# Altium PCB F101S3_KSDIY_V2.PcbDoc (part 2 of 2)
Units mil, origin at the board's own origin, x right, y up, seen from the top; angles counter-clockwise.
Board outline 2606.3 x 2883.86 mil, 2 copper layers (Top Layer, Bottom Layer), stack 54.726 mil thick; 152 components, 110 nets, 618 pads, 637 vias.
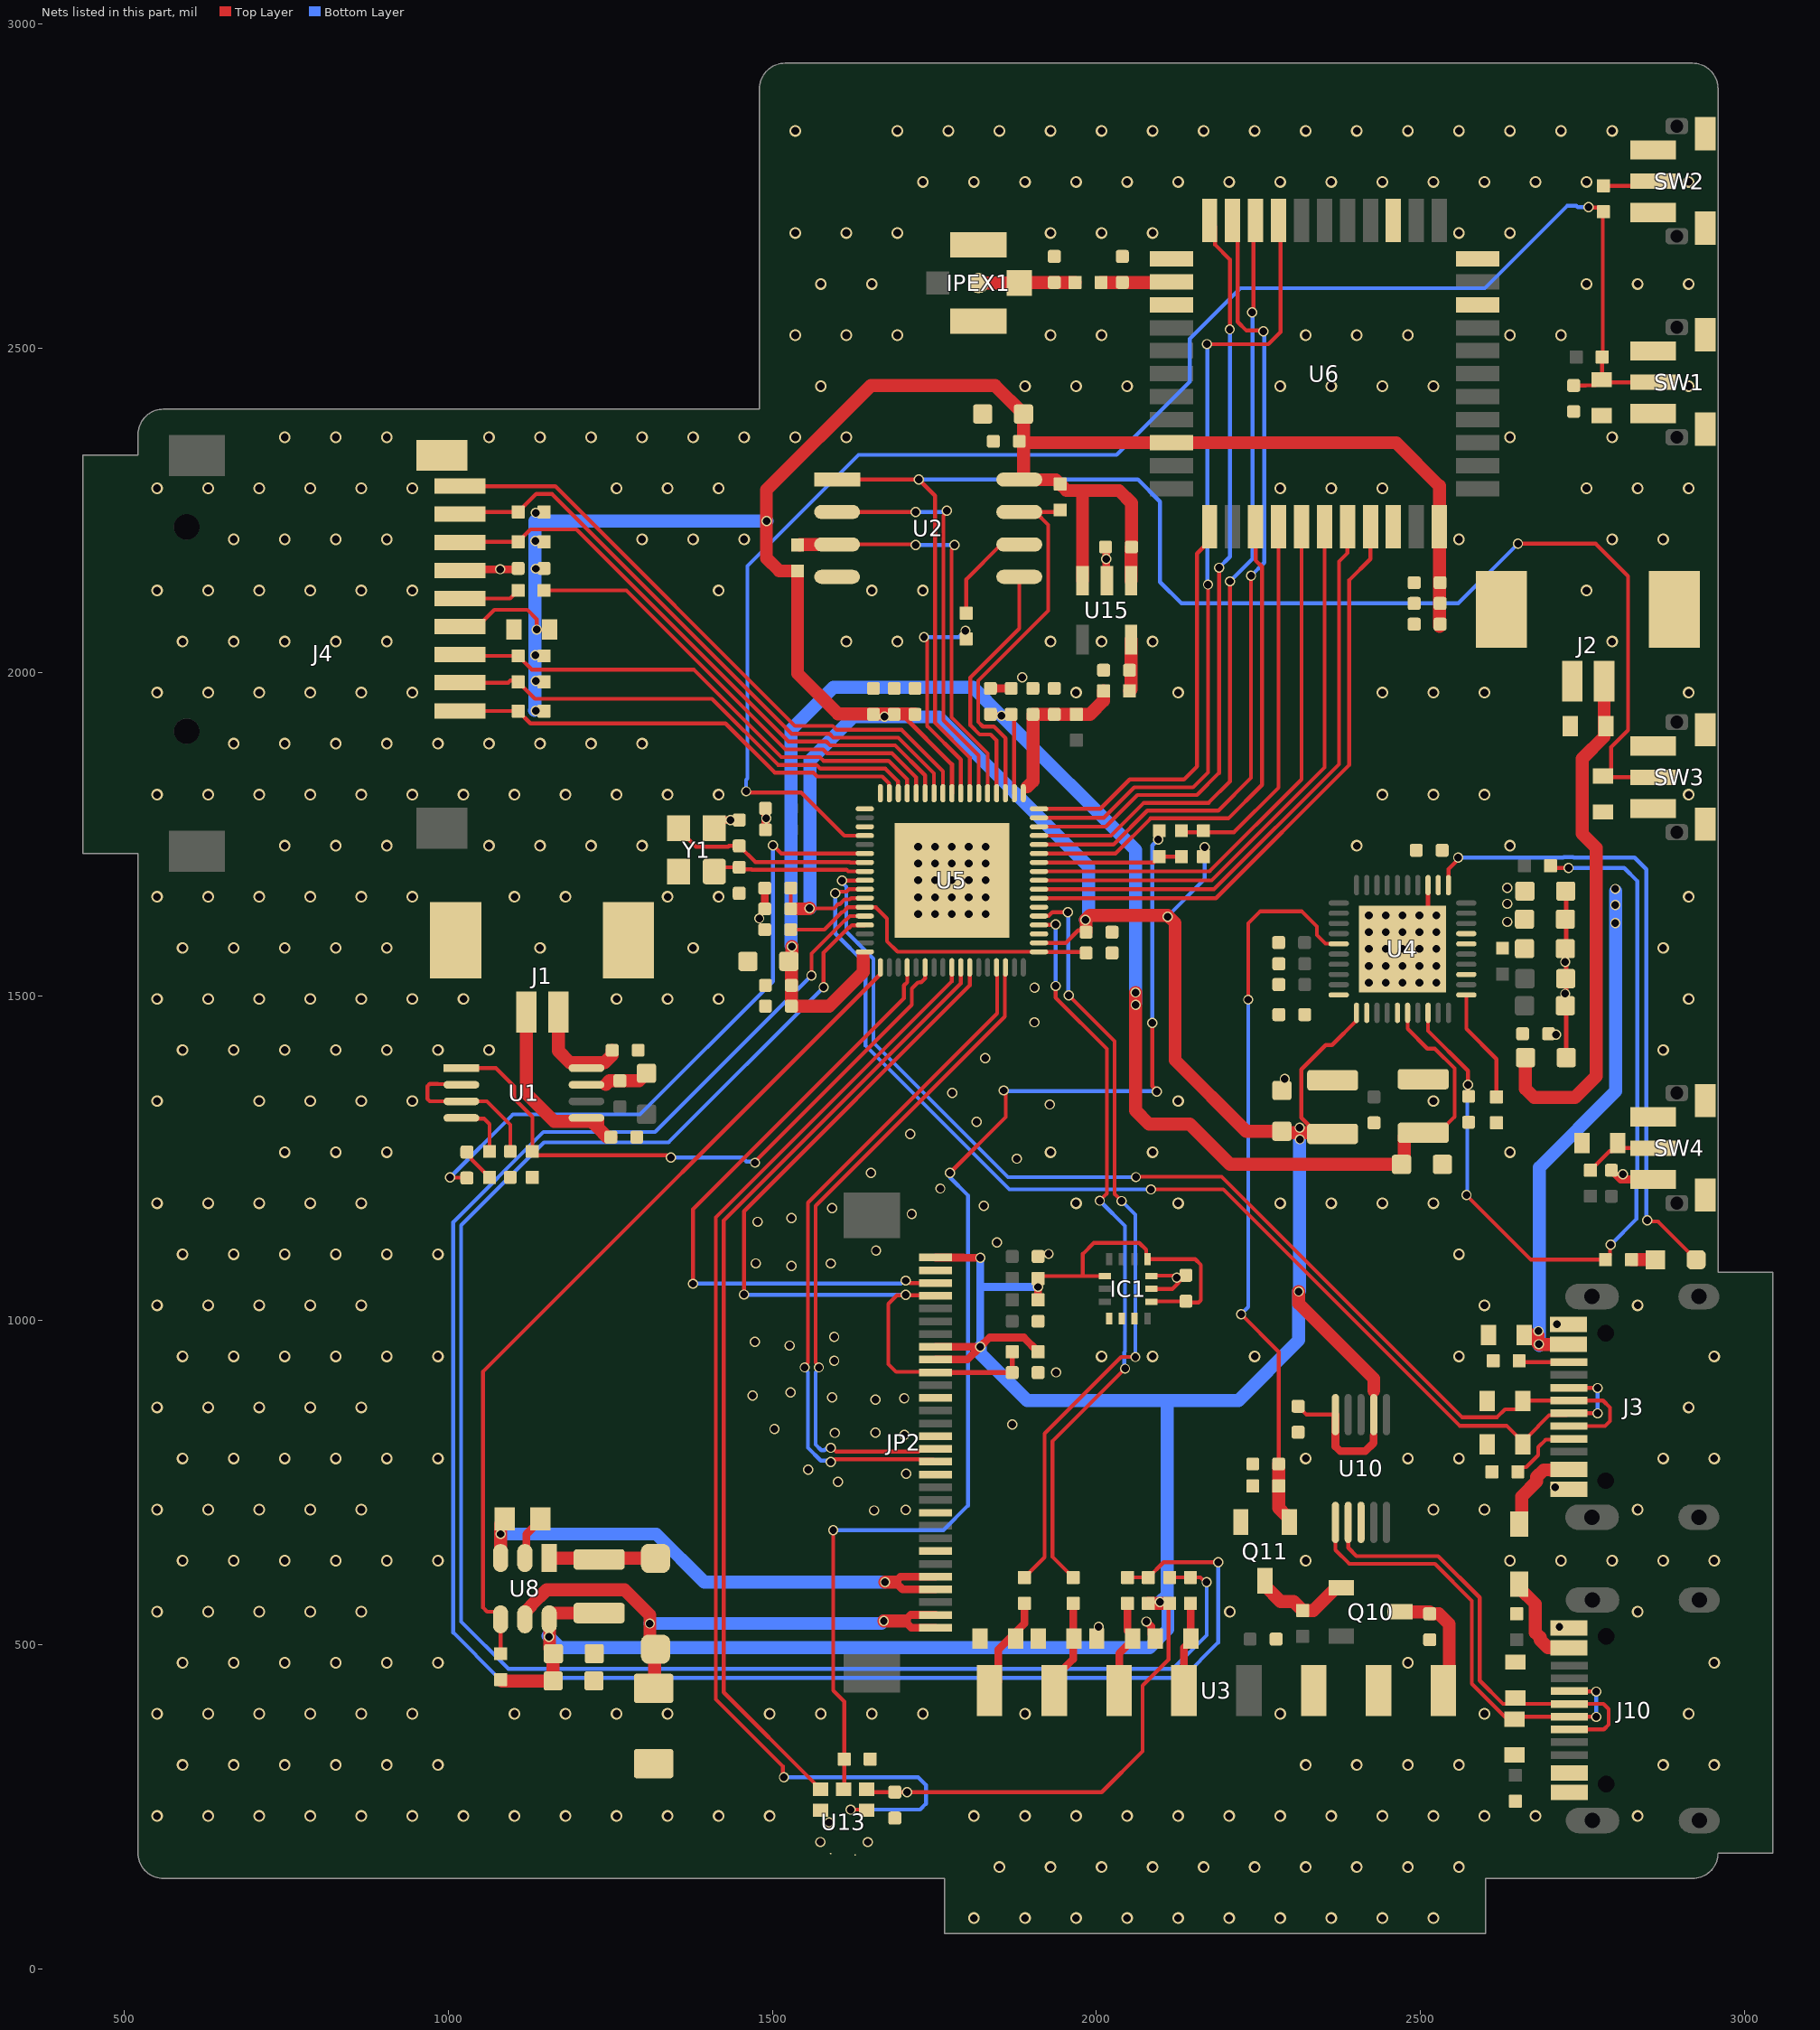
[diagram p2: the nets of this part, all layers, seen from the top]

## Via types
v1: diameter 17.99, hole 12, Top Layer to Bottom Layer, tented both sides, 383 vias
v2: diameter 15.75, hole 11.81, Top Layer to Bottom Layer, tented both sides, 204 vias
v3: diameter 18, hole 12, Top Layer to Bottom Layer, tented both sides, 50 vias

## Nets (pads, with @x,y where several pads share a name; then routed paths per layer and width w, separated by ;. In a path a pad name is that pad's centre, name@x,y a point inside that pad or via, vN(x,y) a via of type N, cw(c..) or ccw(c..) an arc to the next point about the centre after c; other vN are vias at no path point) (continued)
DSI_D1_N: JP2.16 U5.15 | length 1055.1
  Top Layer w6: v2(1571.75,928) 1571.75,930.64 1566.87,935.51 1566.87,1176.9 1843.13,1453.16 1851.76,1461.79 1858.79,1468.82 1858.79,1532.96 1859.68,1533.85 U5.15@1859.68,1544.69 ; v2(1590,804) 1592.64,804 1598.32,798.32 1725.74,798.32 1726.68,799.25 1748.94,799.25 JP2.16@1751.85,802.16
  Bottom Layer w6: v2(1571.75,928) 1571.75,925.36 1566.87,920.49 1566.87,809.02 1575.64,800.25 1580.61,800.25 1582.5,802.13 1588.13,802.13 v2(1590,804)
DSI_D1_P: JP2.17 U5.14 | length 1075.2
  Top Layer w6: v2(1550,928) 1550,930.64 1554.87,935.51 1554.87,1181.87 1831.13,1458.13 1846.79,1473.79 1846.79,1532.96 1845.9,1533.85 U5.14@1845.9,1544.69 ; v2(1590,782.25) 1592.64,782.25 1596.7,786.32 1725.74,786.32 1726.68,785.38 1748.94,785.38 JP2.17@1751.85,782.47
  Bottom Layer w6: v2(1550,928) 1550,925.36 1554.87,920.49 1554.87,804.05 1574.8,784.12 1588.13,784.12 v2(1590,782.25)
DXIN: C8.1 U5.58 Y1.3 | length 311.3
  Top Layer w6: Y1.3@1355.44,1759.46 1355.44,1757.5 1382.16,1730.78 1432,1730.78 1433.22,1732 C8.1@1449,1732 1473.71,1707.29 1619.57,1707.29 1620.3,1706.56 U5.58@1642.69,1706.56
DXOUT: C9.1 U5.59 Y1.1 | length 237.4
  Top Layer w6: Y1.1@1410.56,1692.54 1417.02,1699 C9.1@1449,1699 1451.97,1696.03 1468,1696.03 1468.74,1695.29 1614.6,1695.29 1617.11,1692.78 U5.59@1642.69,1692.78
GND: C1.2 C2.2 C4.1 C5.2 C6.1 C7.2 C8.2 C9.2 C10.2 C11.2 C12.1 C13.2 C36.1 C37.1 C38.2 C39.1 C40.2 C41.2 C42.1 C43.1 C44.1 C45.2 C46.1 C47.1 C48.1 C49.1 C51.2 C52.2 C53.2 C54.1 C55.1 C60.2 C61.1 C62.1 C63.1 C64.1 C65.1 C66.1 C67.1 C68.1 C69.1 C70.1 C71.1 C72.1 C73.1 C74.1 C75.1 C76.1 C77.1 C78.2 C79.2 C80.2 C84.1 C91.1 C93.1 C94.1 C95.1 C102.2 C103.2 C104.2 C105.2 C110.2 C111.2 C113.2 D1.2 D3.2 D4.2 D5.2 D6.2 D7.2 D8.2 D9.2 D12.1 D19.2 D110.2 D111.2 D112.2 D113.2 IC1.1 IC1.2 IC1.3 IC1.6 IC1.7 IPEX1.2 J1.0 J2.0 J2.2 J3.0 J3.A1 J3.A12 J3.B1 J3.B12 J4.6 J4.10 J10.0 J10.A1 J10.A12 J10.B1 J10.B12 JP2.2 JP2.12 JP2.15 JP2.18 JP2.21 JP2.24 Q11.2 R4.1 R12.2 R20.1 R21.2 R38.1 R100.2 R101.2 R104.2 R121.2 SW1.1 SW1.3 SW1.4 SW1.5 SW2.1 SW2.3 SW2.4 SW2.5 SW3.1 SW3.3 SW3.4 SW3.5 SW4.1 SW4.3 SW4.4 SW4.5 U1.7 U2.4 U3.6 U3.7 U4.3 U4.41 U5.69 U6.1 U6.3 U6.20 U6.31 U6.33 U6.36 U8.2 U10.3 U13.2 U13.3 U15.2 Y1.2 Y1.4 | length 969.4
  Top Layer w6: IC1.6@2084.93,1049 2117,1049 2137.34,1069.34 2085.58,1069.34 IC1.7@2084.93,1068.68
  Top Layer w7: v3(2498.05,1625.15) 2499.99,1625.15 2511.42,1636.58 U4.3@2511.42,1671.55 ; C36.1@2723.77,1662.32 2724.22,1661.87 2724.22,1406 C45.2@2724.67,1405.55
  Top Layer w8: v3(1829,1653) 1829,1650.56 U5.69@1839.93,1639.63
  Top Layer w12: J4.6@1018,2156.92 1019.54,2158.46 1106.46,2158.46 C60.2@1108,2160 ; U8.2@1118.4,633.99 1120.63,636.21 1120.63,670.6 1142.56,692.53 R38.1@1142.56,694.5 ; Y1.2@1410.56,1759.46 1410.56,1760.28 1422.28,1772 C8.2@1449,1772 ; C75.1@1488.44,1635 C76.1@1488.44,1667 ; C63.1@1489.44,1757 C65.1@1489.44,1790 ; C67.1@1836.5,1975 C72.1@1868.5,1975 ; C104.2@2014,2193 2014.95,2192.05 2014.95,2141.87 U15.2@2015.9,2140.92 ; v2(2077,536) 2084.64,528.36 2084.64,515.81 D111.2@2090.45,510 ; C51.2@2794.2,1231.86 2808.29,1217.77 SW4.1@2858.62,1217.77
  Top Layer w20: 1243.1,1364 1249,1369.9 1294.5,1369.9 C11.2@1306,1381.39
  other v1: 1811.02,78.74 1889.76,78.74 1968.51,78.74 2047.25,78.74 2125.99,78.74 2204.73,78.74 2283.47,78.74 2362.21,78.74 2440.95,78.74 2519.69,78.74 1850.39,157.48 1929.13,157.48 2007.88,157.48 2086.62,157.48 2165.36,157.48 2244.1,157.48 2322.84,157.48 2401.58,157.48 2480.32,157.48 2559.06,157.48 551.18,236.22 629.92,236.22 708.66,236.22 787.4,236.22 866.14,236.22 944.88,236.22 1023.62,236.22 1102.36,236.22 1181.1,236.22 1259.84,236.22 1338.58,236.22 1417.32,236.22 1496.06,236.22 1811.02,236.22 1889.76,236.22 1968.51,236.22 2047.25,236.22 2125.99,236.22 2204.73,236.22 2283.47,236.22 2362.21,236.22 2440.95,236.22 2519.69,236.22 2598.43,236.22 2677.17,236.22 2834.65,236.22 590.55,314.96 669.29,314.96 748.03,314.96 826.77,314.96 905.51,314.96 984.25,314.96 2322.84,314.96 2401.58,314.96 2480.32,314.96 2559.06,314.96 2874.02,314.96 2952.76,314.96 551.18,393.7 629.92,393.7 708.66,393.7 787.4,393.7 866.14,393.7 944.88,393.7 1102.36,393.7 1181.1,393.7 1259.84,393.7 1338.58,393.7 1496.06,393.7 1574.8,393.7 1653.54,393.7 1732.28,393.7 1889.76,393.7 2283.47,393.7 2598.43,393.7 2913.39,393.7 590.55,472.44 669.29,472.44 748.03,472.44 826.77,472.44 905.51,472.44 984.25,472.44 2480.32,472.44 2952.76,472.44 551.18,551.18 629.92,551.18 708.66,551.18 787.4,551.18 866.14,551.18 2205.65,551.18 2834.65,551.18 590.55,629.92 669.29,629.92 748.03,629.92 826.77,629.92 905.51,629.92 984.25,629.92 2322.84,629.92 2637.8,629.92 2716.54,629.92 2795.28,629.92 2874.02,629.92 2952.76,629.92 551.18,708.66 629.92,708.66 708.66,708.66 787.4,708.66 866.14,708.66 2519.69,708.66 2598.43,708.66 2834.65,708.66 590.55,787.4 669.29,787.4 748.03,787.4 826.77,787.4 905.51,787.4 984.25,787.4 2322.84,787.4 2480.32,787.4 2559.06,787.4 2874.02,787.4 2952.76,787.4 551.18,866.14 629.92,866.14 708.66,866.14 787.4,866.14 866.14,866.14 2913.39,866.14 590.55,944.88 669.29,944.88 748.03,944.88 826.77,944.88 905.51,944.88 984.25,944.88 2007.88,944.88 2086.62,944.88 2244.1,944.88 2559.06,944.88 2952.76,944.88 551.18,1023.62 629.92,1023.62 708.66,1023.62 787.4,1023.62 866.14,1023.62 2598.43,1023.62 2834.65,1023.62 590.55,1102.36 669.29,1102.36 748.03,1102.36 826.77,1102.36 905.51,1102.36 984.25,1102.36 2559.06,1102.36 551.18,1181.1 629.92,1181.1 708.66,1181.1 787.4,1181.1 866.14,1181.1 1968.51,1181.1 2125.99,1181.1 2283.47,1181.1 2362.21,1181.1 2440.95,1181.1 2519.69,1181.1 748.03,1259.84 826.77,1259.84 905.51,1259.84 1929.13,1259.84 2086.62,1259.84 2637.8,1259.84 551.18,1338.58 708.66,1338.58 787.4,1338.58 866.14,1338.58 944.88,1338.58 2125.99,1338.58 2519.69,1338.58 590.55,1417.32 669.29,1417.32 748.03,1417.32 826.77,1417.32 905.51,1417.32 984.25,1417.32 1062.99,1417.32 2874.02,1417.32 551.18,1496.06 629.92,1496.06 708.66,1496.06 787.4,1496.06 866.14,1496.06 944.88,1496.06 1023.62,1496.06 1259.84,1496.06 1338.58,1496.06 1417.32,1496.06 2913.39,1496.06 590.55,1574.8 669.29,1574.8 748.03,1574.8 826.77,1574.8 905.51,1574.8 1141.73,1574.8 1377.95,1574.8 2874.02,1574.8 551.18,1653.54 629.92,1653.54 708.66,1653.54 787.4,1653.54 866.14,1653.54 944.88,1653.54 1102.36,1653.54 1181.1,1653.54 1338.58,1653.54 1417.32,1653.54 2913.39,1653.54 748.03,1732.28 826.77,1732.28 905.51,1732.28 1062.99,1732.28 1141.73,1732.28 1220.47,1732.28 1299.21,1732.28 2401.58,1732.28 2637.8,1732.28 551.18,1811.02 629.92,1811.02 708.66,1811.02 787.4,1811.02 866.14,1811.02 944.88,1811.02 1023.62,1811.02 1102.36,1811.02 1181.1,1811.02 1259.84,1811.02 1338.58,1811.02 1417.32,1811.02 2440.95,1811.02 2519.69,1811.02 2598.43,1811.02 2913.39,1811.02 669.29,1889.76 748.03,1889.76 826.77,1889.76 905.51,1889.76 984.25,1889.76 1062.99,1889.76 1141.73,1889.76 1220.47,1889.76 1299.21,1889.76 551.18,1968.51 629.92,1968.51 708.66,1968.51 787.4,1968.51 866.14,1968.51 944.88,1968.51 1968.51,1968.51 2125.99,1968.51 2440.95,1968.51 2519.69,1968.51 2598.43,1968.51 2913.39,1968.51 590.55,2047.25 669.29,2047.25 748.03,2047.25 826.77,2047.25 905.51,2047.25 1614.17,2047.25 1692.91,2047.25 1929.13,2047.25 2007.88,2047.25 2086.62,2047.25 2795.28,2047.25 551.18,2125.99 629.92,2125.99 708.66,2125.99 787.4,2125.99 866.14,2125.99 944.88,2125.99 1417.32,2125.99 1653.54,2125.99 1732.28,2125.99 2755.91,2125.99 669.29,2204.73 748.03,2204.73 826.77,2204.73 905.51,2204.73 1299.21,2204.73 1377.95,2204.73 1456.69,2204.73 2559.06,2204.73 2795.28,2204.73 2874.02,2204.73 551.18,2283.47 629.92,2283.47 708.66,2283.47 787.4,2283.47 866.14,2283.47 944.88,2283.47 1259.84,2283.47 1338.58,2283.47 1417.32,2283.47 2283.47,2283.47 2362.21,2283.47 2440.95,2283.47 2755.91,2283.47 2834.65,2283.47 2913.39,2283.47 748.03,2362.21 826.77,2362.21 905.51,2362.21 1062.99,2362.21 1141.73,2362.21 1220.47,2362.21 1299.21,2362.21 1377.95,2362.21 1456.69,2362.21 1535.43,2362.21 1614.17,2362.21 2637.8,2362.21 2795.28,2362.21 1574.8,2440.95 1889.76,2440.95 1968.51,2440.95 2047.25,2440.95 2283.47,2440.95 2362.21,2440.95 2440.95,2440.95 2519.69,2440.95 2913.39,2440.95 1535.43,2519.69 1614.17,2519.69 1692.91,2519.69 1929.13,2519.69 2007.88,2519.69 2322.84,2519.69 2401.58,2519.69 2480.32,2519.69 2637.8,2519.69 2716.54,2519.69 1574.8,2598.43 1653.54,2598.43 2755.91,2598.43 2834.65,2598.43 2913.39,2598.43 1535.43,2677.17 1614.17,2677.17 1692.91,2677.17 1929.13,2677.17 2007.88,2677.17 2086.62,2677.17 2559.06,2677.17 2637.8,2677.17 1732.28,2755.91 1811.02,2755.91 1889.76,2755.91 1968.51,2755.91 2047.25,2755.91 2125.99,2755.91 2204.73,2755.91 2283.47,2755.91 2362.21,2755.91 2440.95,2755.91 2519.69,2755.91 2598.43,2755.91 2677.17,2755.91 2755.91,2755.91 2913.39,2755.91 1535.43,2834.65 1692.91,2834.65 1771.65,2834.65 1850.39,2834.65 1929.13,2834.65 2007.88,2834.65 2086.62,2834.65 2165.36,2834.65 2244.1,2834.65 2322.84,2834.65 2401.58,2834.65 2480.32,2834.65 2559.06,2834.65 2637.8,2834.65 2716.54,2834.65 2795.28,2834.65
  other v2: 1574.07,196.06 1647.45,195.95 1587.69,226.26 2003.46,528.05 2714.03,528.19 1656.97,707.31 1705.62,708.06 2707.15,742.96 1601.21,751.47 1706.37,763.82 1555.19,770.18 1703.75,823.7 1596.32,826.99 1659.19,827.48 1503.31,832.86 1870,840 1659.22,878.33 1703.38,880.2 1592.37,881.49 1469.49,884.67 1528.02,889.34 1937.72,920.26 1595.51,937.99 1526.98,961.54 1473.09,967.42 1595.51,975.14 2710.47,994.82 2124.02,1066.26 1529.59,1084.48 1474.53,1088.31 1590.11,1088.22 1926.24,1102.92 1660.07,1108.27 1846.59,1120.8 1477.41,1152.35 1529.59,1158.24 1715.11,1164.48 1592.46,1173.52 1826.35,1177.06 1759.13,1203.79 2811.89,1225.59 1652.21,1227.77 1877.06,1249.78 1712.75,1287.91 1814.95,1306.78 1928.06,1333.28 1777.61,1351.2 2290.42,1372.69 1828.31,1404.65 2709,1441 1904.18,1460.08 2723.04,1504.09 1904.61,1513.56 2723.04,1553.37 1479.88,1620.28 1435.64,1772 1490.85,1774.55 1885.36,1992.2 1080.39,2158.74 2015.2,2174.56
  other v3: 2420.05,1521.15 2446.05,1521.15 2472.05,1521.15 2498.05,1521.15 2524.05,1521.15 2420.05,1547.15 2446.05,1547.15 2472.05,1547.15 2498.05,1547.15 2524.05,1547.15 2420.05,1573.15 2446.05,1573.15 2472.05,1573.15 2498.05,1573.15 2524.05,1573.15 2420.05,1599.15 2446.05,1599.15 2472.05,1599.15 2498.05,1599.15 2524.05,1599.15 2420.05,1625.15 2446.05,1625.15 2472.05,1625.15 2524.05,1625.15 1725,1627 1751,1627 1777,1627 1803,1627 1829,1627 1725,1653 1751,1653 1777,1653 1803,1653 1725,1679 1751,1679 1777,1679 1803,1679 1829,1679 1725,1705 1751,1705 1777,1705 1803,1705 1829,1705 1725,1731 1751,1731 1777,1731 1803,1731 1829,1731
H_RX: D113.1 R113.2 U3.1 | length 156.9
  Top Layer w12: U3.1@1835,429.45 1848.68,443.13 1848.68,492.76 1889,533.08 R113.2@1889,564
H_SCL: D111.1 R111.2 U3.4 | length 139.2
  Top Layer w12: U3.4@2135,429.45 2135,495.5 2145.57,506.06 D111.1@2145.57,510 2145.28,510.28 2145.28,563.72 R111.2@2145,564
H_SDA: D110.1 R110.2 U3.3 | length 147
  Top Layer w12: U3.3@2035,429.45 2035,486.82 2048.43,500.25 2049.76,500.25 2055.57,506.06 D110.1@2055.57,510 2055.57,513.94 2048,521.5 R110.2@2048,564
H_TX: D112.1 R112.2 U3.2 | length 146.6
  Top Layer w12: U3.2@1935,429.45 1935,449.13 1964,478.13 R112.2@1964,564
HPOUT: C3.1 U5.57 | length 1006.3
  Top Layer w6: v2(1003,1221) 1003.5,1220.5 1028.5,1220.5 C3.1@1029,1220 ; v2(1501.22,1733.01) 1513.89,1720.34 U5.57@1642.69,1720.34
  Bottom Layer w6: v2(1003,1221) 1100,1318 1296,1318 1501.22,1523.22 v2(1501.22,1733.01)
I2C2_SCL: R111.1 R118.2 U5.65 | length 2800.9
  Top Layer w6: v2(1579.35,1514.29) 1579,1514.64 1579,1567.57 1617.64,1606.21 1619.14,1606.21 1622.7,1609.77 1642.36,1609.77 U5.65@1642.69,1610.1 ; R118.2@2113,604 2160.36,604 2167.36,597 v2(2170,597)
  Bottom Layer w6: v2(1579.35,1514.29) 1339.94,1274.87 1147.84,1274.87 1020,1147.03 1020,536 1093,463 2118,463 2170,515 v2(2170,597)
I2C2_SDA: R110.1 R117.2 U5.64 | length 2987.5
  Top Layer w6: v2(1560.49,1532.18) 1560.49,1566.03 1612.67,1618.21 1614.17,1618.21 1619.84,1623.88 U5.64@1642.69,1623.88 ; R110.1@2048,604 R117.2@2080,604 2103.53,627.53 v2(2187.65,627.53)
  Bottom Layer w6: v2(1560.49,1532.18) 1319.3,1291 1147,1291 1008,1152 1008,519 1078,449 2133,449 2187.65,503.65 v2(2187.65,627.53)
KEY_ADC: C13.1 D4.1 R7.2 R8.1 SW1.2 U5.55 | length 2540.6
  Top Layer w6: v2(1459.69,1816.16) 1461.56,1814.29 1544.68,1814.29 1611.07,1747.9 U5.55@1642.69,1747.9 ; C13.1@2736,2442 2755,2442 2755.19,2442.19 2770.19,2442.19 D4.1@2779,2451 ; v2(2759,2717) 2759.5,2716.5 2775.5,2716.5 R8.1@2782,2710 2781,2709 2781,2487 R7.2@2780,2486 2780,2452 D4.1@2779,2451 ; SW1.2@2858.62,2447 2783,2447 D4.1@2779,2451
  Bottom Layer w6: v2(1459.69,1816.16) 1459.69,1834.05 1461.68,1836.03 1461.68,2163.68 1633,2335 2031,2335 2144,2448 2144,2514 2222,2592 2599,2592 2726,2719 2740.18,2719 2742.13,2717.05 2758.95,2717.05 v2(2759,2717)
KEY_DOWN: U5.54
KEY_LEFT: U5.52
KEY_RIGHT: U5.20
KEY_UP: U5.51
LCD_BL: R39.1 U5.1 U8.4 | length 1330.6
  Top Layer w6: R39.1@1081,486.5 U8.4@1081,539.5 1081,543.19 1072.86,551.33 1060.19,551.33 1054,557.51 1054,921.56 1666.76,1534.32 U5.1@1666.76,1544.69
LCD_RST: C95.2 JP2.4 JP2.10 R70.2 U5.11 | length 1298.3
  Top Layer w6: v2(1456.44,1040.29) 1456.44,1168.77 1804.56,1516.89 U5.11@1804.56,1544.69 ; JP2.10@1751.85,920.27 1751.12,921 1691,921 1679,933 1679,1026 1692.19,1039.19 1751.04,1039.19 JP2.4@1751.85,1038.38
  Top Layer w8: JP2.10@1751.85,920.27 1751.98,920.13 1869.87,920.13 C95.2@1870,920 R70.2@1870,952
  Bottom Layer w6: v2(1456.44,1040.29) 1456.73,1040 v2(1706,1040)
MIC_BCLK: U5.9 U13.4 | length 1840.2
  Top Layer w6: v2(1518,296) 1516.13,297.87 1516.13,312.87 1413,416 1413,1159.27 1776.67,1522.94 1776.67,1544.36 U5.9@1777,1544.69 ; v2(1621,246) 1644.39,246 U13.4@1645.24,245.15
  Bottom Layer w6: v2(1518,296) 1725,296 1737,284 1737,255 1728,246 v2(1621,246)
MIC_SD: R104.1 R106.2 U13.6 | length 1964.4
  Top Layer w6: v2(1594,677) 1594,429.68 1611,412.68 R104.1@1611,324 1611,278.71 U13.6@1609.8,277.51 ; v2(1774,1228) 1860,1314 v2@1860,1355 ; v2(2086,1459) 2086,1361.5 2093.01,1354.49 v2(2093.01,1353.11) ; v2(2095,1742) 2095,1753.5 R106.2@2097,1755.5
  Bottom Layer w6: v2(1594,677) 1764,677 1801.73,714.73 1801.73,1193.27 1774,1221 v2(1774,1228) ; v2(1857,1355) 1857.95,1354.05 2092.07,1354.05 v2(2093.01,1353.11) ; v2(2086,1459) 2086,1733 v2(2095,1742)
MIC_WS: U5.10 U13.1 | length 1481.5
  Top Layer w6: U13.1@1574.37,277.51 1572.79,277.51 1565.56,284.75 1565.56,286.32 1425,426.88 1425,1154.3 1790.78,1520.08 U5.10@1790.78,1544.69
NetC3_2: C3.2 R1.2 | length 53.5
  Top Layer w6: C3.2@1029,1260 1035.69,1253.31 1035.69,1249.31 R1.2@1064,1221
NetC5_1: C5.1 IPEX1.1 R16.1 | length 86.4
  Top Layer w20: IPEX1.1@1881,2600 1882,2601 R16.1@1967,2601
NetC12_2: C12.2 U1.2 U1.3 | length 259.6
  Top Layer w6: U1.2@1020.54,1363.8 1019.51,1364.83 983.98,1364.83 983.81,1365 971.51,1365 968,1361.49 968,1342 971.8,1338.2 U1.3@1020.54,1338.2 1059.8,1338.2 1096,1302 C12.2@1096,1261
NetC41_1: C41.1 U4.20
NetD2_1: D2.1 R13.1 | length 37
  Top Layer w20: R13.1@2825,1094 D2.1@2862,1094
NetD2_2: D2.2 U4.1 | length 989.3
  Top Layer w6: U4.1@2542.92,1671.55 2542.92,1696.24 2558,1711.32 v2(2558,1714) ; v2(2849.73,1154.77) 2851.59,1152.9 2866.09,1152.9 D2.2@2924.99,1094
  Bottom Layer w6: v2(2558,1714) 2720.14,1714 2721.01,1714.87 2734.99,1714.87 2735.86,1714 2830,1714 2848,1696 2848,1156.5 v2(2849.73,1154.77)
NetD3_1: D3.1 R14.1 SW4.2 | length 119.6
  Top Layer w6: R14.1@2762,1232 2791.25,1261.25 2795.19,1261.25 2804,1270.06 D3.1@2804,1274 2812,1266 SW4.2@2858.62,1266
NetD11_A: D11.1 L2.2 U8.1 | length 164.4
  Top Layer w20: U8.1@1155.8,633.99 1156.05,633.74 1319.76,633.74 D11.1@1320,633.5
NetJ3_A5: J3.A5 R20.2 | length 106.4
  Top Layer w6: R20.2@2650,767 2657,774 2662.85,774 2681.38,792.53 2681.38,804.95 2693,816.57 2727.32,816.57 J3.A5@2728.18,817.43
NetJ3_B5: J3.B5 R21.1 | length 77.4
  Top Layer w6: R21.1@2652,938 2654.11,935.89 J3.B5@2728.53,935.89
NetL1_1: L1.1 U4.22
NetL3_1: L3.1 U4.25
NetQ10_1: Q10.1 Q11.3 R120.2 | length 156.1
  Top Layer w20: Q11.3@2260,599 2260,591.13 2284.13,567 2304,567 R120.2@2318,553 2334.45,553 2369.85,588.4 Q10.1@2377.72,588.4
NetR5_1: R5.1 U5.42 | length 332.4
  Top Layer w6: v2(1734,2054) 1739,2049 1739,1916.97 1790.78,1865.19 U5.42@1790.78,1813.31
  Bottom Layer w6: v2(1734,2054) 1788,2054 v2(1798,2064)
NetR8_2: R8.2 SW2.2 | length 79.5
  Top Layer w6: R8.2@2782,2750 2851.62,2750 SW2.2@2858.62,2757
NetR17_2: R17.2 U5.47 | length 717.7
  Top Layer w6: R17.2@1148,2126 1275.09,2126 1520.09,1881 1578.22,1881 1584.14,1875.08 1684.46,1875.08 1721.88,1837.66 U5.47@1721.88,1813.31
PA_INL-: R1.1 U1.4 | length 89.4
  Top Layer w6: U1.4@1020.54,1312.61 1021.66,1311.5 1055.5,1311.5 1064,1303 R1.1@1064,1261
PD4: R4.2 U1.1 U5.6 | length 968.2
  Top Layer w6: U1.1@1020.54,1389.39 1073.61,1389.39 1101.79,1361.21 1101.79,1342.34 1130,1314.13 R4.2@1130,1261 1136,1255 1337.47,1255 1341.04,1251.43 v2(1343.68,1251.43) ; v2(1473.43,1243.57) 1473.43,1245.43 1715.13,1487.13 1715.13,1511.99 1724.59,1521.46 1727.21,1521.46 1727.62,1521.87 1729.66,1521.87 1735.66,1527.88 U5.6@1735.66,1544.69
  Bottom Layer w6: v2(1343.68,1251.43) 1343.97,1251.71 1453.56,1251.71 1459.84,1245.43 1471.57,1245.43 v2(1473.43,1243.57)
PD21: U5.23
PE4_SEL: R106.1 R107.1 U5.28 | length 223.4
  Top Layer w6: U5.28@1911.31,1706.56 2088.06,1706.56 R106.1@2097,1715.5 R107.1@2131,1715.5
SDC0_CLK: J4.5 R17.1 | length 95.1
  Top Layer w6: J4.5@1018,2113.61 1095.62,2113.61 R17.1@1108,2126
SDC0_CMD: J4.3 R25.1 U5.48 | length 791
  Top Layer w6: J4.3@1018,2027 1020,2025 R25.1@1108,2025 1129,2004 1378.94,2004 1513.94,1869 1573.25,1869 1579.17,1863.08 1679.49,1863.08 1707.77,1834.8 1707.77,1813.64 U5.48@1708.1,1813.31
SDC0_D0: J4.7 R26.1 U5.46 | length 910.4
  Top Layer w6: J4.7@1018,2200.23 1018.77,2201 R26.1@1108,2201 1127,2220 1198.06,2220 1525.06,1893 1583.19,1893 1589.11,1887.08 1689.43,1887.08 1735.66,1840.85 U5.46@1735.66,1813.31
SDC0_D1: J4.8 R27.1 U5.45 | length 953.6
  Top Layer w6: J4.8@1018,2243.54 1021.46,2247 R27.1@1108,2247 1135.84,2274.84 1160.19,2274.84 1530.03,1905 1588.16,1905 1594.08,1899.08 1694.4,1899.08 1749.44,1844.04 U5.45@1749.44,1813.31
SDC0_D2: J4.1 R23.1 U5.50 | length 723.8
  Top Layer w6: J4.1@1018,1940.39 1018.39,1940 R23.1@1108,1940 1127,1921 1428,1921 1504,1845 1563.31,1845 1569.23,1839.08 1669.55,1839.08 1680.21,1828.42 1680.21,1813.64 U5.50@1680.54,1813.31
SDC0_D3: J4.2 R24.1 U5.49 | length 760.2
  Top Layer w6: J4.2@1018,1983.69 1092.69,1983.69 1096,1987 1106,1987 R24.1@1108,1985 1134,1959 1406.97,1959 1508.97,1857 1568.28,1857 1574.2,1851.08 1674.52,1851.08 1693.99,1831.61 1693.99,1813.64 U5.49@1694.32,1813.31
SDC0_DC: J4.9 U5.44 | length 961.2
  Top Layer w6: J4.9@1018,2286.84 1165.16,2286.84 1535,1917 1593.13,1917 1599.05,1911.08 1699.37,1911.08 1763.22,1847.23 U5.44@1763.22,1813.31
SDC2_CLK: U5.26 U6.17 | length 883.4
  Top Layer w6: U5.26@1911.31,1679 2177.61,1679 2351.73,1853.12 U6.17@2351.73,2224
SDC2_CMD: U5.27 U6.16 | length 853.1
  Top Layer w6: U5.27@1911.31,1692.78 2174.42,1692.78 2316.3,1834.66 U6.16@2316.3,2224
SDC2_D0: U5.25 U6.18 | length 914
  Top Layer w6: U5.25@1911.31,1665.22 2181.25,1665.22 2374,1857.97 2374,2170.61 2387.17,2183.77 U6.18@2387.17,2224
SDC2_D1: U5.24 U6.19 | length 944.3
  Top Layer w6: U5.24@1911.31,1651.44 2184.44,1651.44 2390,1857 2390,2142 2422.6,2174.6 U6.19@2422.6,2224
SDC2_D2: U5.29 U6.14 | length 789.7
  Top Layer w6: U5.29@1911.31,1720.34 2029.34,1720.34 2083.5,1774.5 2203.5,1774.5 2255.31,1826.31 2255.31,2162.62 2245.43,2172.49 U6.14@2245.43,2224
SDC2_D3: R105.2 R107.2 U6.15 | length 581.6
  Top Layer w6: R107.2@2131,1755.5 2133.5,1753 2212,1753 2280.87,1821.87 U6.15@2280.87,2224
SPEAKER_N: C6.2 J1.1 U1.8 | length 162.6
  Top Layer w20: J1.1@1170,1476 1170,1416 1188,1398 1241.28,1398 1253,1409.72 C6.2@1253,1417
SPEAKER_P: C2.1 J1.2 U1.5 | length 294.9
  Top Layer w20: J1.2@1120.79,1476 1120.79,1350.21 1163.5,1307.5 1221,1307.5 1231.02,1297.48 ; U1.5@1231.02,1308.52 1231.02,1297.48 ; C2.1@1251,1283 1245.5,1283 1231.02,1297.48
SPI0-CLK: R5.2 U2.6 | length 156.4
  Top Layer w6: R5.2@1799,2091 1799,2143 1853,2197 U2.6@1881,2197
SPI0-CS0: D19.1 SW3.2 U2.1 U5.41 | length 2351.4
  Top Layer w6: U2.1@1600.49,2297 v2(1726,2297) 1751,2272 1751,1921.94 1804.56,1868.38 U5.41@1804.56,1813.31 ; v2(2650,2198) 2770,2198 2820,2148 2820,1910.53 2793.75,1884.28 2793.75,1848.38 2784.94,1839.57 D19.1@2781,1839.57 2782.57,1838 SW3.2@2858.62,1838
  Bottom Layer w6: v2(1726,2297) 2064,2297 2098,2263 2098,2139.03 2130.9,2106.13 2558.13,2106.13 v2(2650,2198)
SPI0-HOLD: R2.2 U2.7 U5.37 | length 566
  Top Layer w6: U5.37@1859.68,1813.31 1859.68,1898.11 1841.79,1916 1824.82,1916 1817.5,1923.32 1817.5,1986.68 1925.43,2094.61 1925.43,2227.17 U2.7@1905.61,2247 ; U2.7@1893.3,2247 1941,2247 R2.2@1944,2250
SPI0-MISO: U2.2 U5.40 | length 630.1
  Top Layer w6: U2.2@1599.98,2247 v2(1721,2247) ; v2(1769,2249) 1769,2246.36 1764,2241.36 1764,1925.91 1818.34,1871.57 U5.40@1818.34,1813.31
  Bottom Layer w6: v2(1721,2247) 1767,2247 v2(1769,2249)
SPI0-MOSI: U2.5 U5.38 | length 391.6
  Top Layer w6: U5.38@1845.9,1813.31 1845.9,1894.92 1836.82,1904 1819.85,1904 1805.5,1918.35 1805.5,1991.65 1881,2067.15 U2.5@1881,2147
SPI0-WP: R3.2 U2.3 U5.39 | length 647.4
  Top Layer w6: U2.3@1599.98,2197 1720,2197 v2(1721,2196) ; v2(1781,2196) 1781,2193.36 1776.49,2188.86 1776.49,1930.38 1832.12,1874.76 U5.39@1832.12,1813.31
  Top Layer w20: R3.2@1542,2196 1543,2197 U2.3@1599.98,2197
  Bottom Layer w6: v2(1721,2196) v2(1781,2196)
TP_INT: JP2.3 U5.4 | length 1002.2
  Top Layer w6: v2(1377.8,1056.89) 1377.8,1171.8 1703.13,1497.13 1703.13,1516.96 1708.1,1521.93 U5.4@1708.1,1544.69 ; v2(1705.83,1061.75) 1708.47,1061.75 1712.15,1058.06 JP2.3@1751.85,1058.06
  Bottom Layer w6: v2(1377.8,1056.89) 1378.07,1057.16 1698.6,1057.16 1703.19,1061.75 v2(1705.83,1061.75)
TS: R12.1 U4.31 | length 176.6
  Top Layer w6: U4.31@2570.45,1502.28 2570.45,1449.98 2617,1403.43 R12.1@2617,1345
UART2_CTS: U5.33 U6.41 | length 1245.2
  Top Layer w6: U5.33@1911.31,1775.46 2011.14,1775.46 2058.18,1822.5 2149,1822.5 2172,1845.5 v2(2172,2135) ; v2(2170.39,2505.73) 2265.23,2505.73 2284,2524.5 2284,2693.31 U6.41@2280.87,2696.44
  Bottom Layer w6: v2(2170.39,2505.73) 2171.19,2504.93 2171.19,2135.81 v2(2172,2135)
UART2_RTS: U5.32 U6.44 | length 1184.1
  Top Layer w6: U5.32@1911.31,1761.68 2014.33,1761.68 2063.15,1810.5 2155,1810.5 2189,1844.5 v2(2189,2161) ; U6.44@2174.57,2696.44 2183.07,2687.94 2183.07,2658.93 2205.84,2636.16 2205.84,2528.89 v2(2205.55,2528.6)
  Bottom Layer w6: v2(2189,2161) 2205.84,2177.84 2205.84,2528.31 v2(2205.55,2528.6)
UART2_RX: U5.31 U6.42 | length 1211
  Top Layer w6: U5.31@1911.31,1747.9 2022.44,1747.9 2073.04,1798.5 2173,1798.5 2206,1831.5 v2(2206,2140) ; v2(2240.16,2554.74) 2242.03,2556.61 2242.03,2693.03 U6.42@2245.43,2696.44
  Bottom Layer w6: v2(2206,2140) 2240.62,2174.62 2240.62,2554.28 v2(2240.16,2554.74)
UART2_TX: U5.30 U6.43 | length 1272.7
  Top Layer w6: U5.30@1911.31,1734.12 2026.15,1734.12 2078.53,1786.5 2188,1786.5 2238.43,1836.93 v2(2238.43,2148.57) ; U6.43@2210,2696.44 2217.84,2688.6 2217.84,2540.16 2231.27,2526.73 2256.44,2526.73 v2(2257.5,2525.68)
  Bottom Layer w6: v2(2238.43,2148.57) 2258.91,2169.05 2258.91,2524.27 v2(2257.5,2525.68)
UART4_RX: R113.1 U5.22 | length 1199.9
  Top Layer w6: R113.1@1889,604 1920,635 1920,825.86 2038.14,944 v2(2060,944) ; U5.22@1911.31,1623.88 1911.64,1624.21 1926.35,1624.21 1926.94,1624.8 1927.01,1624.8 1932.21,1630 v2(1956,1630) ; v2(1957.43,1501.43) 2028,1430.86 2028,1195.34 v2(2038.93,1184.41)
  Bottom Layer w6: v2(1956,1630) 1956.72,1629.28 1956.72,1502.15 v2(1957.43,1501.43) ; v2(2038.93,1184.41) 2060,1163.34 v2(2060,944)
UART4_TX: R112.1 U5.21 | length 1148.3
  Top Layer w6: U5.21@1911.31,1610.1 1936.1,1610.1 v2(1937,1611) ; v2(1937,1516) 1937,1498 2016,1419 2016,1196 v2(2005,1185) ; R112.1@1964,604 1932,636 1932,814 v2(2044,926)
  Bottom Layer w6: v2(1937,1516) v2(1937,1611) ; v2@2007.51,1187.51 2007.51,1182.49 2044,1146 2044,951.86 2043.13,950.99 2043.13,926.87 v2(2044,926)
USB2_DM: D8.1 J10.A7 J10.B7 U10.2 | length 706.7
  Top Layer w6: U10.2@2388.32,688.93 2388.32,649.68 2401,637 2527,637 2591,573 2591,445 2626.94,409.06 J10.A7@2729.23,409.06 2781.94,409.06 2790,401 2790,377 2782.69,369.69 J10.B7@2729.23,369.69
USB2_DP: D9.1 J10.A6 J10.B6 U10.1 | length 707.6
  Top Layer w6: U10.1@2368.63,688.93 2368.63,646.37 2390,625 2522.03,625 2579,568.03 2579,440.03 2629.65,389.38 J10.A6@2729.23,389.38 2770.62,389.38 v2(2771,389) ; J10.B6@2729.23,428.75 2729.6,428.37 2770.63,428.37 v2(2771,428)
  Bottom Layer w6: v2(2771,389) v2(2771,428)
USB-DM: D6.1 J3.A7 J3.B7 U5.60 | length 1785.6
  Top Layer w6: v2(1607.61,1678.41) 1607.91,1678.71 1642.4,1678.71 U5.60@1642.69,1679 ; v2(2060.74,1221.33) 2061.41,1222 2193,1222 2563.75,851.25 2617.99,851.25 2629.99,863.25 2648.76,863.25 2657.57,872.06 D6.1@2657.57,876 2658.4,876.84 J3.A7@2728.53,876.84 2781.16,876.84 2792,866 2792,845 2784.47,837.47 J3.B7@2728.53,837.47
  Bottom Layer w6: v2(1607.61,1678.41) 1607.61,1675.77 1614.13,1669.26 1614.13,1599.87 1656,1558 1656,1429 1863.67,1221.33 v2(2060.74,1221.33)
USB-DP: D7.1 J3.A6 J3.B6 U5.61 | length 1791
  Top Layer w6: v2(1597.25,1659.1) 1599.12,1660.96 1603.64,1660.96 1604.21,1661.54 1614.6,1661.54 1618.28,1665.22 U5.61@1642.69,1665.22 ; v2(2084.05,1202.36) 2195.67,1202.36 2560.03,838 2632.51,838 D7.1@2657.57,812.94 ; D7.1@2657.57,809 D7.1@2657.57,812.94 ; J3.B6@2728.53,896.52 2728.79,896.26 2772.74,896.26 v2(2773,896) ; v2(2773,857) 2772.85,857.15 J3.A6@2728.53,857.15 2725.63,854.25 2698.14,854.25 2681.32,837.43 2681.32,836.69 D7.1@2657.57,812.94
  Bottom Layer w6: v2(1597.25,1659.1) 1597.25,1596.93 1644,1550.18 1644,1424.03 1865.67,1202.36 v2(2084.05,1202.36) ; v2(2773,857) v2(2773,896)
VBUS: C36.2 C37.2 D5.1 D100.1 J3.A4 J3.A9 J3.B4 J3.B9 U4.37 | length 913.2
  Top Layer w20: D100.1@2652,686.16 2655.78,689.94 2655.78,728.78 2679,752 2679,759 2690,770 2701.25,770 J3.A4@2701.49,769.76 ; D5.1@2660,978 2681.09,978 v2@2681.09,964.95 ; v2@2682.42,963.41 J3.B4@2700.79,963.41
  Bottom Layer w20: v2@2683,962 2683,1236 2800.8,1353.8 v2@2800.8,1662.71
  other v2: 2682.42,963.61 2681.62,983.86 2800.28,1613.05 2633.49,1614.87 2800.28,1640.92 2633.49,1642.74 2800.28,1665.69 2633.49,1667.51
VBUS2: D100.2 J10.A4 J10.A9 J10.B4 J10.B9 | length 121.8
  Top Layer w20: D100.2@2652,593.84 2652,587.93 2677,562.93 2677,519 2684.37,511.63 2684.37,507.75 2696.21,495.91 J10.A9@2701.72,495.91
VCC1V2: C105.1 R108.1 U15.5 | length 80
  Top Layer w20: R108.1@2051,1971 2053.3,1973.3 U15.5@2053.3,2050.08
VCC-1V8: C47.2 C48.2 U5.18 U5.63 | length 519.7
  Top Layer w6: C47.2@1528.44,1603 1580.49,1603 1607.7,1630.21 1609.2,1630.21 1616.53,1637.54 1642.57,1637.54 U5.63@1642.69,1637.66 1643.02,1637.33 1659.67,1637.33 1677,1620 1677,1585 1693.24,1568.76 U5.18@1911.31,1568.76 1911.64,1568.43 1982.57,1568.43 C48.2@1984,1567
VCC-PSRAM: C61.2 C62.2 R6.2 R108.2 U5.35 | length 248.3
  Top Layer w20: 1893.32,1823 1901.98,1831.66 C62.2@1901.98,1935 C61.2@1935,1935 1990,1935 2011,1956 R108.2@2011,1971
VCC_3V3: C7.1 C40.1 C60.1 C70.2 C71.2 C73.2 C74.2 C75.2 C76.2 C77.2 C78.1 C79.1 C80.1 C84.2 C93.2 C94.2 C102.1 C103.1 C104.1 D12.2 IC1.5 IC1.8 IC1.12 J4.4 JP2.1 JP2.8 JP2.9 L1.2 L2.1 R2.1 R3.1 R23.2 R24.2 R25.2 R26.2 R27.2 R39.2 R47.1 R48.1 R70.1 R105.1 R117.1 R118.1 U2.8 U4.21 U5.19 U5.43 U5.62 U6.9 U6.22 U8.6 U10.7 U10.10 U13.5 U15.1 U15.3 | length 10378.8
  Top Layer w6: J4.4@1018,2070.31 1045.56,2070.31 1071.25,2096 1122.24,2096 1136.63,2081.62 v2(1136.63,2065.52) 1156.07,2065.52 D12.2@1156.55,2066 ; C75.2@1528.44,1635 C76.2@1528.44,1667 ; v2(1557.58,1635.82) 1595.46,1635.82 1601.87,1642.22 1604.24,1642.22 1611.56,1649.54 1619.57,1649.54 1621.47,1651.44 U5.62@1642.69,1651.44 ; U13.5@1645.24,277.51 1649.75,273 C103.1@1689,273 2008,273 2071,336 2071,437.23 2111.26,477.49 2111.26,562.26 R118.1@2113,564 ; C77.2@1656,1935 C73.2@1688,1935 ; 1699.11,1928.31 1694.69,1928.31 C73.2@1688,1935 ; C74.2@1720,1935 C73.2@1688,1935 ; R48.1@1910,1065 1913.68,1068.68 1979,1068.68 ; U5.19@1911.31,1582.54 1952.51,1582.54 1971.97,1602 1981,1602 C94.2@1984,1599 ; IC1.12@2013.07,1068.68 1979,1068.68 ; IC1.5@2084.93,1029.32 2085.27,1029.66 2137.66,1029.66 C84.2@2138,1030 2140,1028 2157.49,1028 2161,1031.51 2161,1086 2152.23,1094.77 IC1.8@2078.53,1094.77 2076.61,1096.69 2076.61,1109.39 2066,1120 1996,1120 1979,1103 1979,1068.68 ; R105.1@2165,1715.5 2167,1717.5 v2(2167,1730) ; C102.1@2311,868 2323.93,855.07 U10.10@2368.63,855.07 ; L1.2@2364.27,1287.98 2340.65,1287.98 2338.64,1289.99 2315.9,1312.73 2315.9,1387.37 2353.51,1424.97 2363.22,1424.97 2401.18,1462.94 U4.21@2401.18,1474.75 ; U10.7@2427.69,855.07 2427.69,892
  Top Layer w7: 1699.11,1935.48 1777,1857.59 U5.43@1777,1813.31
  Top Layer w12: JP2.9@1751.85,939.95 1801.05,939.95 v2(1820.73,959.64) ; JP2.8@1751.85,959.64 v2(1820.73,959.64) ; JP2.1@1751.85,1097.43 1751.94,1097.34 1794.79,1097.34 1795.13,1097 v2(1821,1097) ; R70.1@1910,952 1888,974 1835.09,974 v2(1820.73,959.64) ; R47.1@1910,1032 R48.1@1910,1065 ; U10.10@2368.63,855.07 2368.63,806.03 2375.66,799 2415,799 2427.3,811.3 U10.7@2427.3,823.35
  Top Layer w20: R39.2@1081,446.5 1083,444.5 C71.2@1162,444.5 1162,489.26 1156.5,494.77 1156.5,538.81 U8.6@1155.8,539.5 ; U8.6@1155.8,547.49 1157.48,549.16 L2.1@1233,549.16 ; C75.2@1528.44,1635 1556.76,1635 v2(1557.58,1635.82) ; R3.1@1539,2153.96 1539,1998 1601.52,1935.48 1699.11,1935.48 C74.2@1719.54,1935.48 ; R3.1@1539,2156 1511,2156 1491,2176 1491,2281 1652,2442 1843.5,2442 C93.2@1887.5,2398 C7.1@1887.5,2357 ; U2.8@1881,2297 1881.32,2296.69 1937.31,2296.69 R2.1@1944,2290 1954,2280 1982,2280 ; U2.8@1886.73,2297 1887.5,2297.77 C7.1@1887.5,2357 ; U15.3@1978.5,2140.92 1978.5,2276.5 1982,2280 ; C94.2@1984,1599 1984,1617 v2(1983,1618) 1990,1625 2109.57,1625 2121.28,1613.28 2121.28,1401.72 2231,1292 C40.1@2286,1292 2288.01,1289.99 2338.64,1289.99 2362.27,1289.99 L1.2@2364.27,1287.98 ; U15.1@2053.3,2140.92 2053.3,2192.3 C104.1@2054,2193 2054,2261 2035,2280 1982,2280 ; R117.1@2080,564 R118.1@2113,564 ; v2(2312,1045) 2312,1026.34 2427.69,910.65 2427.69,892 ; C80.1@2528.9,2070.9 U6.22@2528.9,2224 2528.9,2287.1 2462.08,2353.92 U6.9@2115.51,2353.92 1890.58,2353.92 C7.1@1887.5,2357
  Bottom Layer w6: v2(2110,1623) 2110,1624 2167,1681 v2(2167,1730)
  Bottom Layer w12: v2(1820.73,959.64) 1820.73,1052 ; v2(1821,1097) 1820.73,1096.73 1820.73,1052 ; v2(1910,1052) 1820.73,1052
  Bottom Layer w20: v2@1133,1941 1133.77,1941.77 1133.77,2233 v2@1492,2233 ; v2@1154,514 1172.19,495.81 2081.81,495.81 2110.13,524.13 2110.13,571.57 ; v2(1557.58,1635.82) 1558,1636.24 1558,1864 1625,1931 1757,1931 1988,1700 1988,1623 v2(1983,1618) ; v2(1820.73,959.64) 1820.73,949.27 1893,877 2109,877 ; v2(2098,566) 2109,577 2109,877 ; v2(2312,1045) 2312,970 2219,877 2109,877 ; v2@2313.33,1046.33 v2@2313.33,1289.99
  other v2: 1708,273 1155.38,512.45 2313.56,1279.68 2313.41,1297.65 1672.96,1931.44 1134.99,1940.51 1135.54,1986.23 1134.45,2026.33 1135.36,2159.5 1134.81,2202.5 1491.46,2232.96 1135,2245.76
VCC_BAT_IN: C44.2 C45.1 D1.1 J2.1 U4.33 | length 808.7
  Top Layer w20: C45.1@2661.68,1405.55 2661.68,1357.32 2675,1344 2738,1344 2771,1377 2771,1729 2749.25,1750.75 2749.25,1866.66 2783,1900.4 J2.1@2783,1986
VDD-SYS: C1.1 C66.2 C67.2 C68.2 C69.2 C72.2 L3.2 U4.26 U5.36 U5.68 | length 2596.5
  Top Layer w6: C67.2@1836.5,1935 C72.2@1868.5,1935 1873.13,1930.36 1873.13,1813.64 U5.36@1873.46,1813.31 ; U4.26@2479.92,1474.75 2479.92,1450 2510.39,1419.52 2521.89,1419.52 2552.37,1389.05 2552.37,1314.41 2527.62,1289.66 L3.2@2504,1289.66
  Top Layer w20: v2(1530.21,1577) 1530.21,1554.77 1529.44,1554 C68.2@1529.44,1485 1587.67,1485 1640.23,1537.56 1640.23,1557.33 1639.96,1557.6 1639.96,1561.89 ; v2(2060.17,1506.11) 2060.17,1323.83 2081,1303 2144,1303 2206,1241 C1.1@2470.5,1241 2474.93,1245.43 2474.93,1283.91 2480.68,1289.66 L3.2@2504,1289.66
  Bottom Layer w20: v2(1530.21,1577) 1530.21,1577.25 1529,1578.45 1529,1911 1594.47,1976.47 1809.53,1976.47 1853.51,1932.49 2060.17,1725.83 v2@2060.17,1489.8
  other v2: 2060.67,1486.88 1853.76,1932.74
VLED+: C64.2 D11.2 JP2.29 JP2.30 U8.5 | length 850.8
  Top Layer w12: JP2.30@1751.85,526.57 1714.43,526.57 1704,537 1713.25,546.25 JP2.29@1751.85,546.25
  Top Layer w20: U8.5@1118.4,539.5 1118.4,550.32 1127.99,559.91 1127.99,560.86 1152.13,585 1272.14,585 1311.14,546 v2(1311.14,533) 1311.14,502.36 D11.2@1320,493.5 1318.5,492 1318.5,434.57 C64.2@1317,433.07 ; v2(1672,537) 1704,537
  Bottom Layer w20: v2(1311.14,533) 1668,533 v2(1672,537)
VLED-: JP2.26 JP2.27 R38.2 U8.3 | length 836.2
  Top Layer w12: JP2.27@1751.85,585.62 1700.88,585.62 1689.5,597 1697.81,605.31 JP2.26@1751.85,605.31
  Top Layer w20: U8.3@1081,633.99 v2@1081,670 ; v2(1081,671) v2@1081,670 ; R38.2@1087.44,694.5 1087.44,692.53 1081,686.09 v2@1081,670 ; v2(1674,597) 1689.5,597
  Bottom Layer w20: v2(1081,671) 1321,671 1395,597 v2(1674,597)
VMID: C39.2 R11.1 U4.36
VREF: C46.2 U4.2
VRTC: C52.1 R13.2 R15.2 U4.28 | length 1332.6
  Top Layer w6: U4.28@2511.42,1474.75 2511.42,1446.97 2573,1385.39 v2(2573,1363.78) C52.1@2573,1342.17 ; v2(2570.64,1193.57) 2670.21,1094 R13.2@2785,1094 2792,1101 2792,1116 v2(2793,1117) ; R15.2@2700.27,1701.32 2703.6,1698 v2(2728,1698)
  Bottom Layer w6: v2(2570.64,1193.57) 2571.82,1194.75 2571.82,1362.6 v2(2573,1363.78) ; v2(2728,1698) 2814,1698 2834,1678 2834,1221 2833,1220 2833,1157 v2(2793,1117)
VSYS_EXT: C111.1 Q10.3 U3.8 | length 188.6
  Top Layer w20: Q10.3@2468.27,551 C111.1@2514,551 ; C111.1@2514,548 2528,548 2544,532 2544,438.45 U3.8@2535,429.45
VSYS_EXT_EN: C113.1 Q11.1 R121.1 U4.15 | length 1135.8
  Top Layer w6: v2(2223,1010) 2281,952 C113.1@2281,779 ; v2(2234,1495) 2234,1612.6 2252.4,1631 2316.87,1631 2340,1607.87 2340,1594.68 2353.3,1581.37 2373.29,1581.37 U4.15@2373.65,1581.02
  Top Layer w20: C113.1@2281,779 R121.1@2281,745 2281,710.95 2292.72,699.24 2295.59,699.24 2297.4,697.42 Q11.1@2297.4,689.55
  Bottom Layer w6: v2(2223,1010) 2234,1021 v2(2234,1495)
WIFI_ANT: C53.1 R16.2 U6.2 | length 108.9
  Top Layer w20: R16.2@2007,2601 2114.56,2601 U6.2@2115.51,2601.95
WL_REG_ON: U5.34 U6.12 | length 648.3
  Top Layer w6: U5.34@1911.31,1789.24 2006.11,1789.24 2051.37,1834.5 2135,1834.5 2155.13,1854.63 2155.13,2182.91 2174.57,2202.35 U6.12@2174.57,2224
pads on no net: IC1.4 IC1.9 IC1.10 IC1.11 IPEX1.3 J3.1 J3.A8 J3.B8 J4.0 J4.11 J4.12 J4.13 J10.1 J10.A8 J10.B8 JP2.0 JP2.7 JP2.11 JP2.22 JP2.23 JP2.25 JP2.28 SW1.0 SW2.0 SW3.0 SW4.0 U4.4 U4.5 U4.6 U4.7 U4.8 U4.9 U4.10 U4.11 U4.12 U4.13 U4.14 U4.19 U4.27 U4.32 U4.35 U5.5 U5.7 U6.4 U6.5 U6.6 U6.7 U6.8 U6.10 U6.11 U6.13 U6.21 U6.23 U6.24 U6.25 U6.26 U6.27 U6.28 U6.29 U6.30 U6.32 U6.35 U6.37 U6.38 U6.39 U6.40 U10.4 U10.5 U10.6 U15.4

## Polygon pours and split planes (outlines as drawn)
GND on Top Layer "GND_L01_P000" (solid, remove dead copper, pour order 0): 500,3074 510,3084 3040,3084 3040,79 2965,4 2960,9 465,9 465,3029 515,3079
GND on Bottom Layer "GND_L02_P001" (solid, remove dead copper, pour order 1): 500,3074 510,3084 3040,3084 3040,79 2965,4 2960,9 465,9 465,3029 515,3079

## Keep-outs
Keep-Out Layer:
  circle w2: c1610,196 r20
  lines w11.81: 437.01,1720.47 437.01,2334.65 521.65,2334.65 521.65,2366.14 cw(c561.02,2366.14) 561.02,2405.51 1480.32,2405.51 1480.31,2899.61 cw(c1519.68,2899.61) 1519.68,2938.98 2919.29,2938.98 cw(c2919.29,2899.61) 2958.66,2899.61 2958.66,1074.8 3043.31,1074.8 3043.31,179.13 2958.66,179.13 cw(c2919.29,179.13) 2919.29,139.76 2600,139.76 2600,55.12 1766,55.12 1766,139.76 561.02,139.76 cw(c561.02,179.13) 521.65,179.13 521.65,1720.47 437.01,1720.47

## Other copper
Top Layer:
  region net VBUS2: 2701.69,507.23 2701.69,484.23 2756.69,484.23 2772.69,468.23 2817.69,468.23 2829.69,456.23 2829.69,346.23 2815.69,332.23 2775.69,332.23 2758.69,315.23 2701.69,315.23 2701.69,291.23 2763.69,291.23 2780.69,308.23 2839.69,308.23 2864.69,333.23 2864.69,475.23 2847.69,492.23 2771.69,492.23 2757.69,506.23 2703.69,506.23
  region net AXP_VSYS: 2333.12,1554.48 2327.27,1560.32 2311.27,1560.32 2309.05,1558.1 2309.05,1543.55 2316.27,1536.32 2340.96,1536.32 2349.78,1545.15 2388.05,1545.15 2390.05,1547.15 2390.05,1552 2388.11,1553.94
  region net AXP_VSYS: 2555.95,1554.52 2554.12,1552.69 2554.12,1547.07 2556.05,1545.15 2603.05,1545.15 2618.05,1530.15 2618.05,1473.15 2625.05,1466.15 2669.05,1466.15 2673.05,1470.15 2673.05,1542.15 2668.12,1547.07 2625.12,1547.07 2617.68,1554.52
  region net NetL3_1: 2461.9,1492.48 2459.56,1490.13 2459.56,1364.44 2467,1357 2511.47,1357 2511.47,1387 2468.53,1445 2468.53,1490.23 2466.27,1492.48
  region net VCC_BAT_IN: 2556.19,1538.51 2554.12,1536.44 2554.12,1531.07 2556.05,1529.15 2589.05,1529.15 2596.05,1522.15 2596.05,1449.18 2646.22,1399 2667,1399 2667,1451.19 2662.68,1455.52 2625.08,1455.52 2610.05,1470.55 2610.05,1526.15 2597.69,1538.51
  region net VBUS: 2600.05,1601.15 2556.05,1601.15 2554.05,1599.15 2554.05,1594.65 2556.32,1592.38 2619.55,1592.38 2623.31,1596.15 2630.05,1596.15 2669.05,1596.15 2673.05,1600.15 2673.05,1676.98 2668.88,1681.15 2629.05,1681.15 2622.05,1674.15 2622.05,1623.15
  region net VBUS: 2701,975 2701,952 2756,952 2772,936 2817,936 2829,924 2829,814 2815,800 2775,800 2758,783 2701,783 2701,759 2763,759 2780,776 2839,776 2864,801 2864,943 2847,960 2771,960 2757,974 2703,974
  region net NetC41_1: 2310.27,1464.39 2310.27,1482.22 2349.68,1506.55 2387.68,1506.55 2390.68,1503.55 2390.68,1495.28 2387.94,1492.55 2356.5,1492.55 2328.22,1464.27
  region net NetL1_1: 2414.83,1491.48 2412.48,1489.13 2412.48,1457.58 2362.27,1407.37 2362.27,1354.15 2404.28,1354.15 2404.28,1386.98 2421.45,1445.74 2421.45,1489.23 2419.2,1491.48
  region net VREF: 2522.76,1733.35 2525.55,1736.15 2539.45,1736.15 2543.27,1732.32 2543.27,1709.32 2531.55,1697.6 2531.55,1657.15 2529.55,1655.15 2524.69,1655.15 2522.76,1657.08
  region net VMID: 2556.2,1585.44 2554.05,1583.29 2554.05,1579.15 2556.53,1576.67 2586.53,1576.67 2599.05,1564.15 2621.05,1564.15 2627.05,1558.15 2669.05,1558.15 2673.05,1562.15 2673.05,1585.44 2669.29,1589.2 2627.76,1589.2 2624.01,1585.44
Bottom Layer:
  region net AXP_VSYS: 2310.63,1437.02 2310.63,1555.02 2319.63,1564.02 2354.63,1564.02 2361.63,1557.02 2361.63,1476.02 2383.63,1454.02 2496.63,1454.02 2574.34,1531.73 2660.92,1531.73 2673.63,1519.02 2673.63,1490.02 2662.63,1479.02 2584.63,1479.02 2517.63,1412.02 2335.63,1412.02
  region net VBUS: 2812,1670 2812,1609.95 2803.9,1602.9 2625.39,1602.9 2618.39,1609.9 2618.39,1671.9 2626.39,1679.9 2802.1,1679.9

## Silkscreen, mask and mechanical layers (free items; w line width, h text height)
Top Overlay:
  region: 751 vertices and 5 holes, not listed, extent 680.08,715.54 1075.71,1111.17
  text "酷世DIY" at 1892,2758.5 h236.22
  text "TF-CARD" at 1065.09,2315.24 h100
  text "+" at 2857,1945.93 h80
  text "+" at 2639.11,1731.82 h118.11
  text "SPEAKER" at 559,1536.24 h100
  text "F101" at 1694.07,1465.55 h78.74
Mechanical 1:
  the board outline again, w11.81
Mechanical 2:
  lines w0.5: 591.61,1247.94 ccw(c634.91,1247.94) 678.22,1247.94 678.22,1332.58 ccw(c634.91,1332.58) 591.61,1332.58 591.61,1247.94 ; 1566.03,2754.68 ccw(c1609.34,2754.68) 1652.65,2754.68 1652.65,2839.33 ccw(c1609.34,2839.33) 1566.03,2839.33 1566.03,2754.68 ; 2442.99,1015.72 ccw(c2486.3,1015.72) 2529.61,1015.72 2529.61,1100.36 ccw(c2486.3,1100.36) 2442.99,1100.36 2442.99,1015.72
Top Assembly:
  circle w0.5: c2486.3,1100.36 r39.37
  circle w0.5: c1609.34,2839.33 r39.37
  circle w0.5: c634.91,1332.58 r39.37
Bottom Assembly:
  circle w0.5: c2486.3,1100.36 r86.61
  circle w0.5: c1609.34,2839.33 r86.61
  circle w0.5: c634.91,1332.58 r86.61
Top Courtyard:
  lines w0.5: 519.68,137.8 2960.63,137.8

## Text inside footprints (layer, text, board x,y; h text height)
J3: Top Overlay "USB" at 2874,797 h50 r90
J10: Top Overlay "USB" at 2874.69,329.23 h50 r90